# Altium PCB MiniPC.PcbDoc (part 23 of 24)
Units mm, origin at the board's own origin, x right, y up, seen from the top; angles counter-clockwise.
Board outline 175 x 155 mm, 16 copper layers (1_Top, 2_int1_(gnd), 3_int2_(power), 4_int3_(gnd), 5_int4_(sign), 6_int5_(power), 7_int6_(sign), 8_int7_(power), 9_int8_(gnd), 10_int9_(sign), 11_int10_(gnd), 12_int11_(sign), 13_int12_(gnd), 14_int13_(power), 15_int14_(gnd), 16_Bottom), stack 2.008 mm thick; 1046 components, 837 nets, 6010 pads, 4009 vias.
Unrouted connection lines stored in the file: 564.
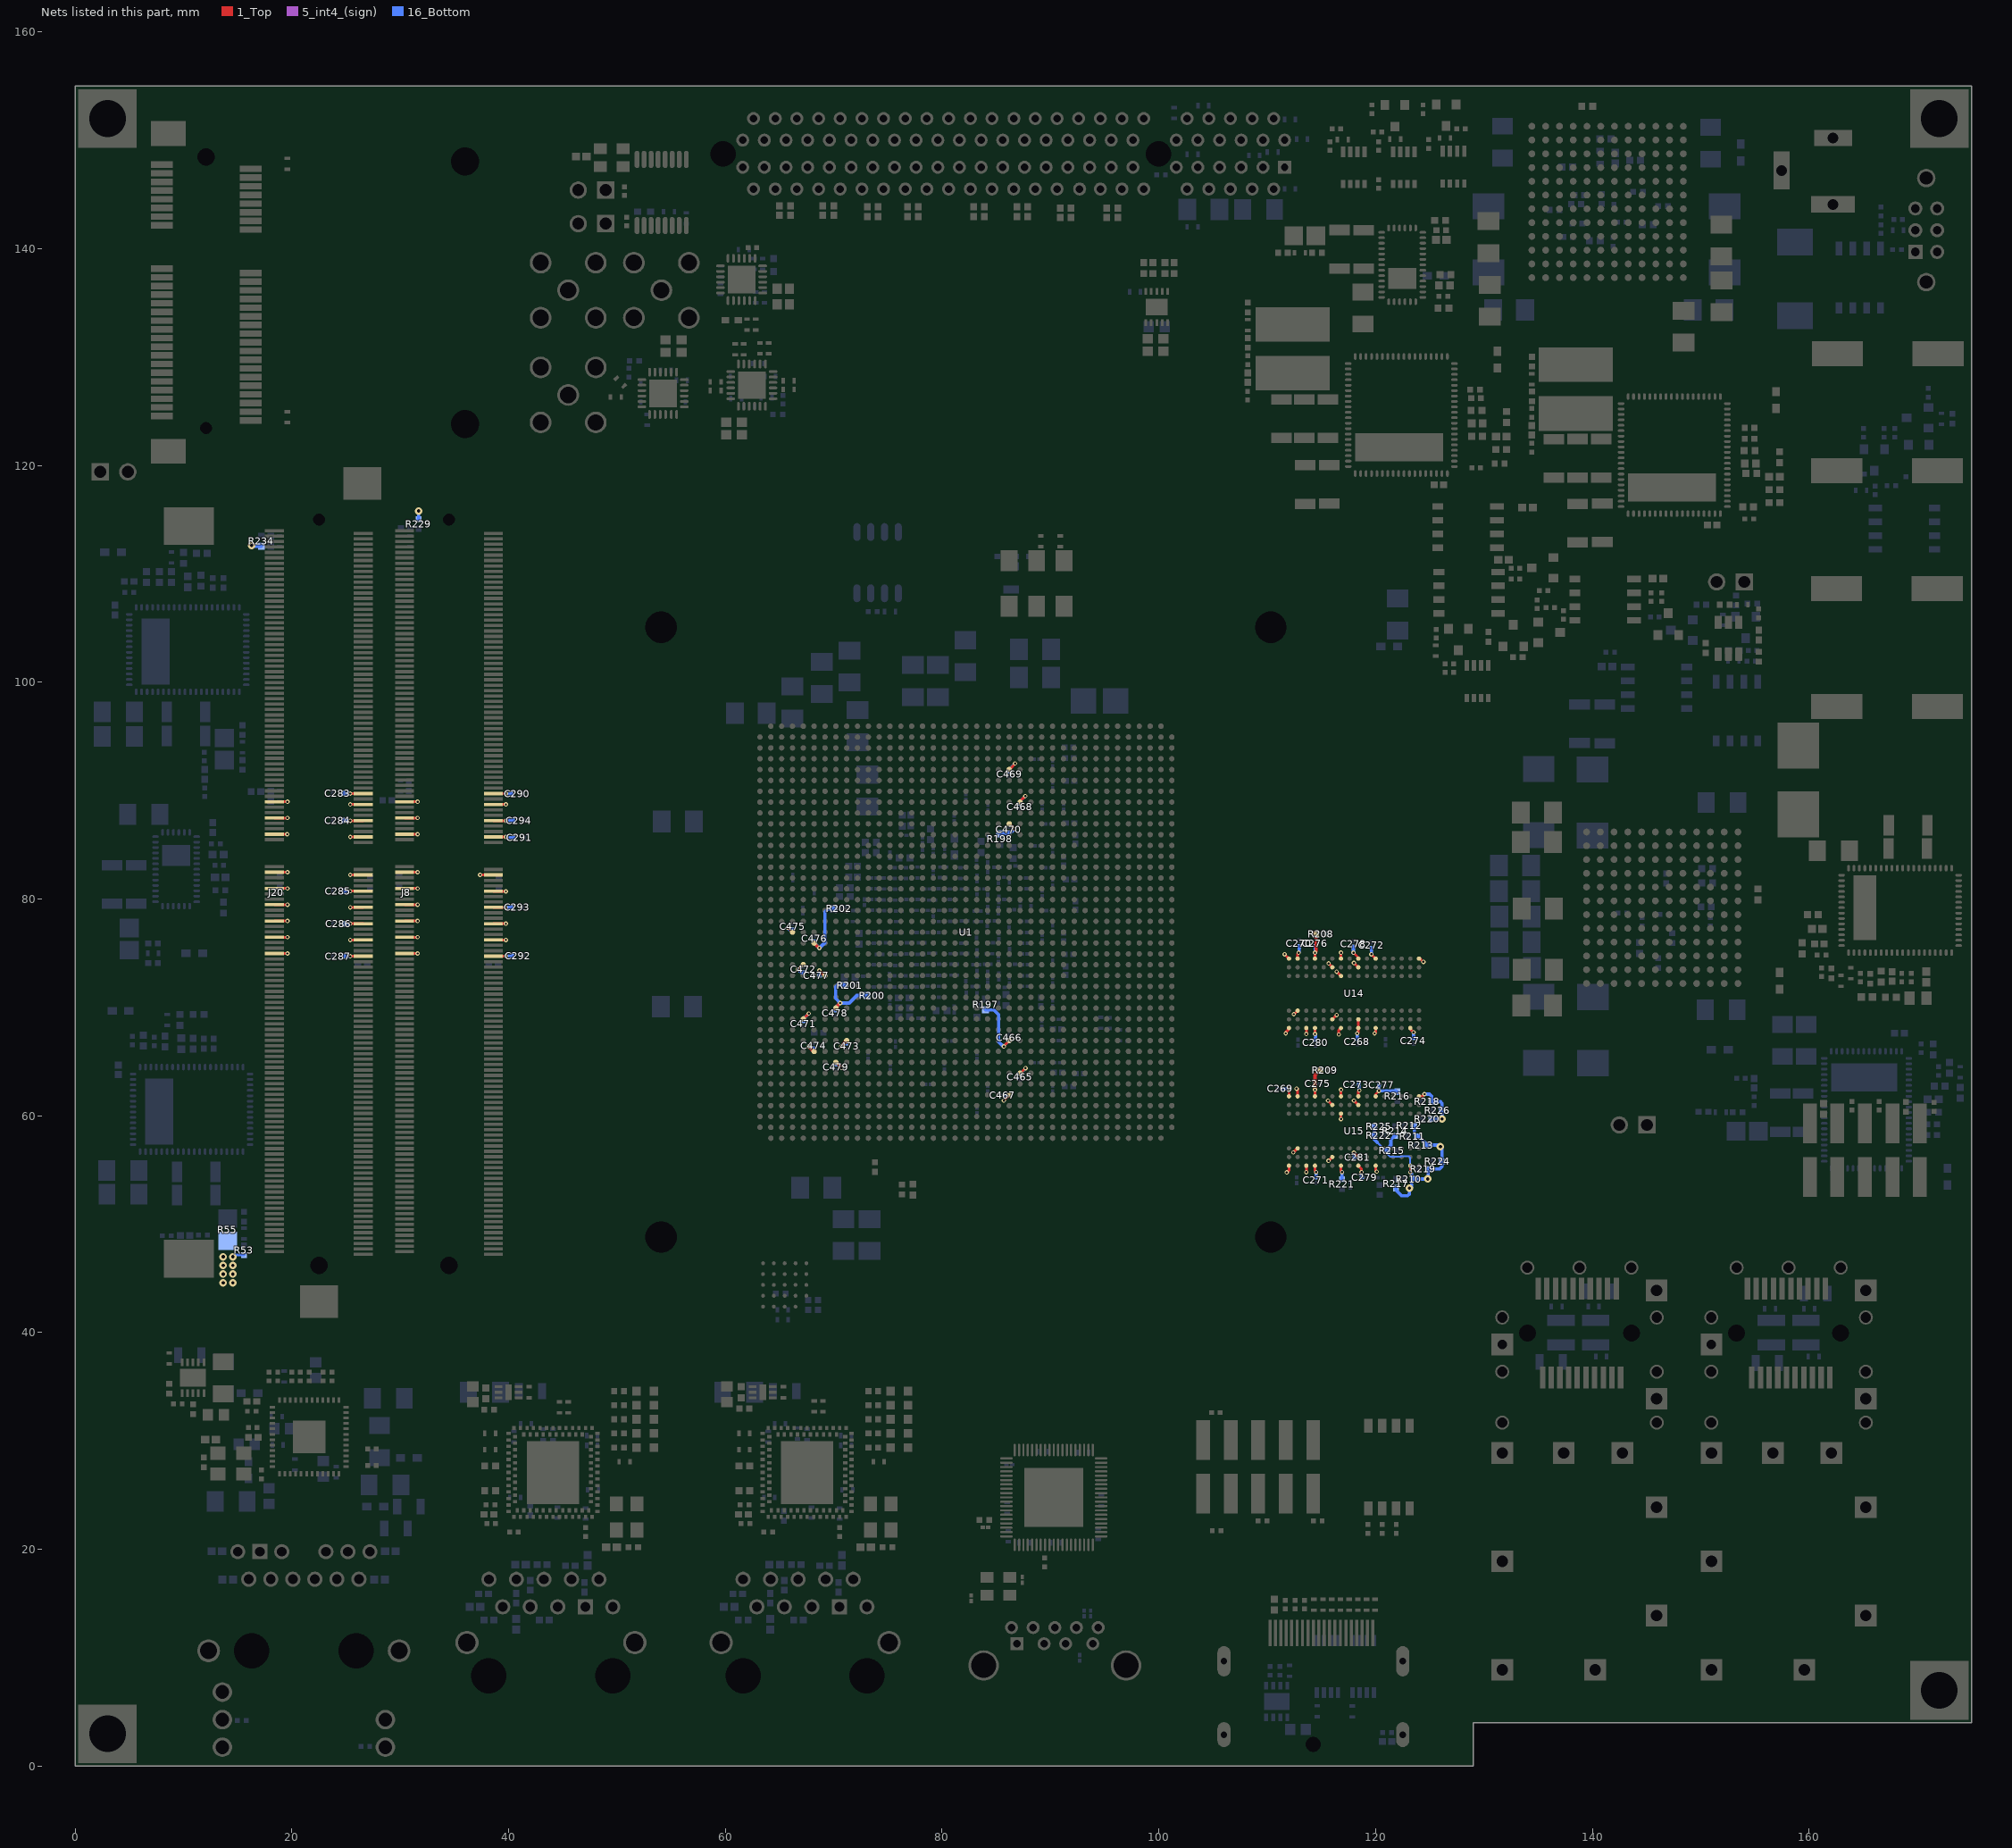
[diagram p35: the nets of this part, all layers, seen from the top]

## Via types
v1: diameter 0.4, hole 0.2, 1_Top to 16_Bottom, tented both sides, 1658 vias
v2: diameter 0.5, hole 0.2, 1_Top to 16_Bottom, tented both sides, 1014 vias
v3: diameter 0.7, hole 0.3, 1_Top to 16_Bottom, tented both sides, 915 vias
v4: diameter 0.6, hole 0.2, 1_Top to 16_Bottom, tented both sides, 278 vias
v5: diameter 0.4, hole 0.2, 1_Top to 16_Bottom, 93 vias
v6: diameter 0.4/0/0/0/0/0/0/0/0/0/0/0/0/0/0/0.4 (per signal layer), hole 0.2, 1_Top to 16_Bottom, tented both sides, 18 vias
v7: diameter 0.4/0/0/0/0/0/0/0/0/0/0/0.4/0.4/0.4/0.4/0.4 (per signal layer), hole 0.2, 1_Top to 16_Bottom, tented both sides, 16 vias
v8: diameter 0.5, hole 0.254, 1_Top to 16_Bottom, tented both sides, 15 vias
v9: diameter 0.5, hole 0.2, 1_Top to 16_Bottom, 2 vias

## Nets (pads, with @x,y where several pads share a name; then routed paths per layer and width w, separated by ;. In a path a pad name is that pad's centre, name@x,y a point inside that pad or via, vN(x,y) a via of type N, cw(c..) or ccw(c..) an arc to the next point about the centre after c; other vN are vias at no path point) (continued)
VDD_DDR: C268.2 C269.2 C270.2 C271.2 C272.2 C273.2 C274.2 C275.2 C276.2 C277.2 C278.2 C279.2 C280.2 C281.2 C283.1 C284.1 C285.1 C286.1 C287.1 C290.1 C291.1 C292.1 C293.1 C294.1 C465.2 C466.2 C467.2 C468.2 C469.2 C470.2 C471.2 C472.2 C473.2 C474.2 C475.2 C476.2 C477.2 C478.2 C479.2 J8.111 J8.112 J8.117 J8.118 J8.123 J8.124 J8.129 J8.130 J8.135 J8.136 J8.141 J8.142 J8.147 J8.148 J8.153 J8.154 J8.159 J8.160 J8.163 J20.111 J20.112 J20.117 J20.118 J20.123 J20.124 J20.129 J20.130 J20.135 J20.136 J20.141 J20.142 J20.147 J20.148 J20.153 J20.154 J20.159 J20.160 J20.163 R53.2 R55.1 R197.1 R198.1 R200.1 R201.1 R202.1 R208.2 R209.2 R210.2 R211.1 R212.1 R213.1 R214.1 R215.1 R216.1 R217.1 R218.1 R219.1 R220.1 R221.1 R222.1 R224.1 R225.1 R226.1 R229.1 R234.1 U1.AA6 U1.AC5 U1.AD7 U1.AG8 U1.AH5 U1.AK9 U1.AK24 U1.AL6 U1.AM8 U1.AN25 U1.AR24 U1.E24 U1.H25 U1.K24 U1.Y4 U14.A1 U14.A9 U14.B3 U14.B9 U14.C1 U14.D1 U14.D9 U14.F2 U14.F8 U14.G1 U14.G7 U14.G9 U14.J1 U14.J2 U14.J8 U14.J9 U14.L1 U14.L9 U14.R1 U14.T9 U15.A1 U15.A9 U15.B3 U15.B9 U15.C1 U15.D1 U15.D9 U15.F2 U15.F8 U15.G1 U15.G7 U15.G9 U15.J1 U15.J2 U15.J8 U15.J9 U15.L1 U15.L9 U15.R1 U15.T9 | length 155.2
  1_Top w0.25: J20.112@18.4,74.975 v1(19.602,74.975) ; J20.118@18.4,76.475 v1(19.602,76.475) ; J20.124@18.4,77.975 v1(19.602,77.975) ; J20.130@18.4,79.475 v1(19.602,79.475) ; J20.136@18.4,80.975 v1(19.602,80.975) ; J20.142@18.4,82.475 v1(19.602,82.475) ; J20.148@18.4,85.975 v1(19.572,85.975) ; J20.154@18.4,87.475 v1(19.602,87.475) ; J20.160@18.4,88.975 v1(19.602,88.975) ; v1(25.398,74.725) J20.111@26.6,74.725 ; v1(25.398,76.225) J20.117@26.6,76.225 ; v1(25.398,77.725) J20.123@26.6,77.725 ; v1(25.398,79.225) J20.129@26.6,79.225 ; v1(25.398,80.725) J20.135@26.6,80.725 ; v1(25.398,82.225) J20.141@26.6,82.225 ; v1(25.398,85.725) J20.147@26.6,85.725 ; v1(25.398,87.225) J20.153@26.6,87.225 ; v1(25.398,88.725) J20.159@26.6,88.725 ; v1(25.398,89.725) J20.163@26.6,89.725 ; J8.112@30.4,74.975 v1(31.602,74.975) ; J8.118@30.4,76.475 v1(31.602,76.475) ; J8.124@30.4,77.975 v1(31.602,77.975) ; J8.130@30.4,79.475 v1(31.602,79.475) ; J8.136@30.4,80.975 v1(31.602,80.975) ; J8.142@30.4,82.475 v1(31.602,82.475) ; J8.148@30.4,85.975 v1(31.602,85.975) ; J8.154@30.4,87.475 v1(31.602,87.475) ; J8.160@30.4,88.975 v1(31.602,88.975) ; v1(37.375,82.225) J8.141@38.6,82.225 ; J8.111@38.6,74.725 v1(39.75,74.725) ; J8.117@38.6,76.225 v1(39.75,76.225) ; J8.123@38.6,77.725 v1(39.75,77.725) ; J8.129@38.6,79.225 v1(39.725,79.225) ; J8.135@38.6,80.725 J8.135@38.621,80.704 ; J8.147@38.6,85.725 v1(39.75,85.725) ; J8.153@38.6,87.225 v1(39.75,87.225) ; J8.159@38.6,88.725 v1(39.75,88.725) ; J8.163@38.6,89.725 v1(39.75,89.725) ; v1(39.752,80.704) J8.135@38.621,80.704 ; v1(65.725,77.35) 65.725,77.311 65.822,77.311 U1.Y4@66.194,76.939 U1.Y4@66.161,76.939 ; v1(66.7,73.5) 67.139,73.939 U1.AC5@67.194,73.939 U1.AC5@67.194,73.919 ; U1.AH5@67.194,68.939 v1(67.694,69.439) ; v1(85.7,61.4) 85.7,61.445 U1.AR24@86.194,61.939 ; v1(85.7,66.4) 85.7,66.445 U1.AK24@86.194,66.939 ; U1.K24@86.194,86.939 86.683,86.45 v1(86.7,86.45) ; U1.E24@86.194,91.939 86.725,92.47 v1(86.725,92.5) ; U1.AN25@87.194,63.939 87.239,63.939 v1(87.7,64.4) ; U1.H25@87.194,88.939 87.194,89.019 v1(87.675,89.5) ; v1(111.6,74.9) U14.A9@112,74.5 ; v1(111.7,67.6) 111.7,67.7 112,68 U14.A1@112,68.1 ; v1(111.8,54.775) 112,54.975 U15.A1@112,55.4 ; U15.A9@112,61.8 v1(112,62.5) ; v1(112.4,56.622) 112.778,57 U15.B3@112.8,57 ; v1@112.439,69.383 v1(112.45,69.372) 112.461,69.361 U14.B3@112.8,69.7 ; v1(112.7,62.5) 112.8,62.5 U15.B9@112.8,61.8 ; U14.B9@112.8,74.5 112.8,74.95 v1(112.9,75.05) ; v1(113.6,54.8) U15.C1@113.6,55.4 ; v1(113.6,67.55) U14.C1@113.6,68.1 ; U15.D1@114.4,55.4 114.4,54.9 v1(114.5,54.8) ; U15.D9@114.4,61.8 v1(114.4,62.4) ; v1(114.4,67.55) U14.D1@114.4,68.1 ; U14.D9@114.4,74.5 v1(114.4,75.05) ; v1(115.6,61.4) U15.F8@116,61 ; v1(115.65,55.85) U15.F2@116,56.2 ; v1(115.661,74.061) 115.661,74.039 U14.F8@116,73.7 ; U14.F2@116,68.9 v1(116.4,69.3) ; v1(116.4,73.3) U14.G7@116.8,72.9 ; v1(116.6,67.5) 116.6,67.9 U14.G1@116.8,68.1 ; U15.G1@116.8,55.4 116.8,54.9 v1(116.9,54.8) ; v1(116.8,59.7) U15.G7@116.8,60.2 ; U15.G9@116.8,61.8 v1(116.8,62.4) ; U14.G9@116.8,74.5 v1(116.8,75.05) ; v1(117.95,75.05) 118.4,74.6 U14.J9@118.4,74.5 ; v1(118,56.6) U15.J2@118.4,56.2 ; v1(118,61.4) U15.J8@118.4,61 ; v1(118,74.1) U14.J8@118.4,73.7 ; v1(118.3,67.6) 118.35,67.6 118.4,67.65 U14.J1@118.4,68.1 U14.J2@118.4,68.9 ; U15.J1@118.4,55.4 118.675,55.125 118.675,54.8 v1(118.7,54.8) ; U15.J9@118.4,61.8 118.4,62.25 v1(118.5,62.35) ; v1(119.6,74.9) U14.L9@120,74.5 ; v1(119.9,67.6) 120,67.7 U14.L1@120,68.1 ; U15.L1@120,55.4 120,54.95 v1(120.1,54.85) ; U15.L9@120,61.8 120,62 v1(120.3,62.3) ; v1(123.2,54.8) U15.R1@123.2,55.4 ; U14.R1@123.2,68.1 123.2,68 v1(123.5,67.7) ; U15.T9@124,61.8 124.3,61.8 v1(124.5,62) ; U14.T9@124,74.5 124.078,74.5 124.378,74.2 v1(124.4,74.2) ; J8.135@38.621,80.704 38.617,80.7 38.613,80.704 J8.135@38.621,80.704
  1_Top w0.3: v1(67.675,66.4) 68.136,65.939 U1.AL6@68.194,65.939 ; U1.AA6@68.194,75.939 68.194,75.931 68.65,75.475 v1(68.675,75.475) ; v1(68.675,73.4) 69.136,72.939 U1.AD7@69.194,72.939 ; U1.AM8@70.194,64.939 70.236,64.939 70.725,64.45 v1(70.725,64.425) ; U1.AG8@70.194,69.939 70.194,69.994 v1(70.6,70.4) ; v1(70.675,66.4) 70.675,66.42 U1.AK9@71.194,66.939 ; v1(114.4,62.4) 114.4,63.778 114.833,64.211 R209.2@114.891,64.211 ; v1(114.4,75.05) 114.5,75.15 114.5,76.756 R208.2@114.503,76.759
  5_int4_(sign) w0.25: v1@65.725,77.311 v1(65.725,77.35)
  16_Bottom w0.17: 120.15,57.55 120.9,56.8 R215.1@121.075,56.8 121.075,56.504 121.354,56.225 122.325,56.225 122.383,56.283 123.017,56.283 123.175,56.125 123.175,56.012 123.165,56.002 123.165,54.835 v1(123.2,54.8)
  16_Bottom w0.25: v3@14.61,47.16 R53.2@15.59,47.16 ; v1(85.7,61.4) 85.86,61.56 C467.2@85.86,61.9 ; v1(85.7,66.4) 85.7,66.44 C466.2@86.2,66.94 ; C470.2@86.175,86.165 86.415,86.165 v1(86.7,86.45) ; C469.2@86.225,91.76 86.225,92 v1(86.725,92.5) ; C468.2@87.175,88.76 87.175,89 v1(87.675,89.5) ; C465.2@87.2,63.86 87.7,64.36 v1(87.7,64.4)
  16_Bottom w0.3: v3(16.3,112.6) 16.35,112.55 R234.1@17.2,112.55 ; C284.1@24.757,87.249 24.781,87.225 v1(25.398,87.225) ; C283.1@24.757,89.764 24.796,89.725 v1(25.398,89.725) ; C287.1@24.782,74.727 24.784,74.725 v1(25.398,74.725) ; C285.1@24.782,80.721 24.786,80.725 v1(25.398,80.725) ; C286.1@24.808,77.724 C286.1@24.808,77.724 v1(25.398,77.725) ; R229.1@31.7,115.025 v3(31.7,115.8) ; v1(39.725,79.225) 39.727,79.223 C293.1@40.318,79.223 ; v1(39.75,74.725) 39.777,74.752 C292.1@40.394,74.752 ; v1(39.75,85.725) 39.801,85.674 C291.1@40.496,85.674 ; v1(39.75,87.225) 39.774,87.249 C294.1@40.47,87.249 ; v1(39.75,89.725) 39.762,89.713 C290.1@40.292,89.713 ; v1(65.725,77.35) 65.885,77.19 C475.2@66.219,77.19 ; v1(66.7,73.5) 66.96,73.24 C472.2@67.225,73.24 ; C471.2@67.225,68.735 67.225,68.97 v1(67.694,69.439) ; v1(67.675,66.4) 67.86,66.215 C474.2@68.15,66.215 ; C476.2@68.253,76.09 68.253,75.897 v1(68.675,75.475) 69.2,76 69.2,78.825 69.4,79.025 69.925,79.025 R202.1@70,79.1 ; v1(68.675,73.4) 68.685,73.39 C477.2@68.685,72.925 ; C478.2@70.15,69.735 70.15,69.95 v1(70.6,70.4) ; C479.2@70.2,64.76 70.39,64.76 v1(70.725,64.425) ; v1(70.675,66.4) 70.96,66.685 C473.2@71.2,66.685 ; R201.1@71,72.05 70.325,72.05 70.175,71.9 70.175,70.825 v1(70.6,70.4) ; R200.1@73.05,71.1 72.125,71.1 71.425,70.4 v1(70.6,70.4) ; R197.1@84,69.775 84.775,69.775 85.2,69.35 85.2,66.85 85.65,66.4 v1(85.7,66.4) ; R198.1@85.325,86.025 86.035,86.025 C470.2@86.175,86.165 ; C269.2@111.46,62.5 v1(112,62.5) ; v1(112.9,75.05) 112.95,75.1 C270.2@112.95,75.64 ; C275.2@114.39,62.95 114.39,62.41 v1(114.4,62.4) ; v1(114.4,67.55) 114.45,67.5 C280.2@114.45,67.01 ; v1(114.4,75.05) 114.425,75.075 C276.2@114.425,75.64 ; C271.2@114.5,54.335 v1@114.5,54.8 ; R221.1@116.9,54.15 v1@116.9,54.8 ; v1(117.95,75.05) C278.2@117.95,75.59 ; v1(118,56.6) 118.065,56.535 C281.2@118.065,56.175 ; C268.2@118.3,67.11 v1@118.3,67.6 ; C273.2@118.46,62.9 118.46,62.39 v1(118.5,62.35) ; v1(118.7,54.8) 118.7,54.315 C279.2@118.715,54.3 ; v1(119.6,74.9) C272.2@119.6,75.49 ; R225.1@119.875,59 R222.1@119.875,58.2 119.875,57.825 120.15,57.55 ; C277.2@120.315,62.825 120.315,62.315 v1(120.3,62.3) 121.925,62.3 R216.1@122,62.225 ; R215.1@121.075,56.8 121.075,57 121.107,57 121.4,57.293 121.4,57.707 121.375,57.732 121.375,57.782 121.768,58.175 R214.1@121.8,58.175 ; R217.1@121.87,53.325 121.87,53.145 122.385,52.63 122.96,52.63 123.1,52.77 v3(123.1,53.325) ; v3@123.15,53.25 123.325,53.425 R210.2@123.325,54.175 ; v1(123.2,54.8) 123.325,54.675 R210.2@123.325,54.175 ; C274.2@123.5,67.185 v1(123.5,67.7) ; R212.1@123.525,59.1 123.575,59.05 123.575,58.35 R211.1@123.825,58.1 123.974,58.1 124.625,57.449 R213.1@124.625,57.3 125.825,57.3 v3(125.975,57.15) 126.125,57 R224.1@126.125,55.8 126.125,55.325 125.9,55.1 R219.1@124.825,55.1 124.85,55.075 124.85,54.175 v3(124.8,54.175) R210.2@123.325,54.175 ; v1(124.5,62) 124.975,62 125.175,61.8 R218.1@125.175,61.3 125.975,61.3 126.125,61.15 R226.1@126.125,60.5 126.125,59.775 126.05,59.7 R220.1@125.175,59.7
  other v3: 13.67,44.6 14.57,44.6 13.67,45.4 14.57,45.4 13.67,46.2 14.57,46.2 13.67,47 14.57,47 126.125,59.7
pads on no net: D3.5 D3.6 D4.5 D4.6 J6.15 J6.17 J6.25 J7.2 J7.3 J7.5 J7.6 J7.7 J7.8 J7.9 J7.MH1 J7.MH2 J8.87 J8.88 J8.91 J8.92 J8.95 J8.96 J8.97 J8.100 J8.101 J8.104 J8.105 J8.110 J8.134 J8.157 J8.161 J8.162 J8.165 J8.MH1 J8.MH2 J9.MH1 J9.MH2 J10.MH1 J10.MH2 J11.15 J11.MH1 J11.MH2 J12.6 J12.8 J13.3 J13.5 J13.6 J13.8 J13.10 J13.12 J13.14 J13.16 J13.17 J13.19 J13.24 J13.28 J13.39 J13.41 J13.42 J13.45 J13.46 J13.47 J13.48 J13.49 J13.51 J13.MH1 J13.MH2 J14.A5 J14.A6 J14.A7 J14.A8 J14.A19 J14.A32 J14.A33 J14.B5 J14.B9 J14.B11 J14.B12 J14.B30 J14.MH1 J14.MH2 J20.87 J20.88 J20.91 J20.92 J20.95 J20.96 J20.97 J20.100 J20.101 J20.104 J20.105 J20.110 J20.134 J20.157 J20.161 J20.162 J20.165 J20.MH1 J20.MH2 J21.2 J21.3 J21.4 J21.5 J21.6 J21.7 J21.8 J21.9 J21.MH1 J21.MH2 SW1.3 SW1.4 SW1.5 SW1.6 SW1.MH1 SW1.MH2 SW2.1 U1.A2 U1.A3 U1.A4 U1.A5 U1.A10 U1.A14 U1.A15 U1.A17 U1.A18 U1.A28 U1.A32 U1.A33 U1.AC2 U1.AC3 U1.AC7 U1.AC8 U1.AC9 U1.AC11 U1.AD8 U1.AD9 U1.AD10 U1.AE7 U1.AE10 U1.AE11 U1.AE20 U1.AF7 U1.AF9 U1.AF10 U1.AF14 U1.AF15 U1.AF17 U1.AF20 U1.AG5 U1.AG6 U1.AG14 U1.AG15 U1.AG16 U1.AG17 U1.AG20 U1.AG21 U1.AG22 U1.AG24 U1.AH6 U1.AH12 U1.AH13 U1.AH14 U1.AH21 U1.AH22 U1.AH30 U1.AH31 U1.AH39 U1.AJ5 U1.AJ6 U1.AJ11 U1.AJ13 U1.AJ14 U1.AJ15 U1.AJ20 U1.AJ21 U1.AJ32 U1.AJ33 U1.AJ36 U1.AJ37 U1.AK6 U1.AK13 U1.AK15 U1.AK20 U1.AK21 U1.AK22 U1.AK30 U1.AK31 U1.AK34 U1.AK35 U1.AL2 U1.AL14 U1.AL20 U1.AL22 U1.AL24 U1.AL32 U1.AL33 U1.AM2 U1.AM11 U1.AM14 U1.AM21 U1.AM22 U1.AM30 U1.AM31 U1.AM34 U1.AM35 U1.AM38 U1.AM39 U1.AN2 U1.AN8 U1.AN11 U1.AN21 U1.AN22 U1.AN28 U1.AN29 U1.AN32 U1.AN33 U1.AN36 U1.AN37 U1.AP1 U1.AP10 U1.AP21 U1.AP24 U1.AP30 U1.AP31 U1.AP34 U1.AP35 U1.AP38 U1.AP39 U1.AR7 U1.AR10 U1.AR11 U1.AR21 U1.AR22 U1.AR23 U1.AR28 U1.AR29 U1.AR32 U1.AR33 U1.AR36 U1.AR37 U1.AT2 U1.AT7 U1.AT8 U1.AT9 U1.AT10 U1.AT12 U1.AT13 U1.AT22 U1.AT34 U1.AT35 U1.AT38 U1.AT39 U1.AU7 U1.AU10 U1.AU11 U1.AU12 U1.AU21 U1.AU22 U1.AU36 U1.AU37 U1.AV1 U1.AV2 U1.AV3 U1.AV7 U1.AV8 U1.AV21 U1.AV29 U1.AV30 U1.AV34 U1.AV35 U1.AV38 U1.AV39 U1.AW2 U1.AW3 U1.AW8 U1.AW20 U1.AW23 U1.AW30 U1.B1 U1.B4 U1.B5 U1.B6 U1.B7 U1.B14 U1.B15 U1.B16 U1.B21 U1.B24 U1.B26 U1.B30 U1.B31 U1.C1 U1.C2 U1.C3 U1.C4 U1.C6 U1.C7 U1.C8 U1.C11 U1.C12 U1.C16 U1.C17 U1.C18 U1.C19 U1.C21 U1.C22 U1.C23 U1.C25 U1.C26 U1.C32 U1.C33 U1.D1 U1.D3 U1.D4 U1.D5 U1.D6 U1.D8 U1.D10 U1.D11 U1.D18 U1.D19 U1.D20 U1.D21 U1.D23 U1.D34 U1.D35 U1.D38 U1.D39 U1.E1 U1.E2 U1.E3 U1.E5 U1.E6 U1.E7 U1.E8 U1.E10 U1.E11 U1.E12 U1.E13 U1.E15 U1.E16 U1.E17 U1.E18 U1.E21 U1.E22 U1.E26 U1.E36 U1.E37 U1.F2 U1.F3 U1.F4 U1.F5 U1.F7 U1.F8 U1.F9 U1.F10 U1.F12 U1.F13 U1.F14 U1.F15 U1.F17 U1.F25 U1.F34 U1.F35 U1.F38 U1.F39 U1.G1 U1.G2 U1.G4 U1.G5 U1.G6 U1.G7 U1.G9 U1.G10 U1.G11 U1.G12 U1.G14 U1.G16 U1.G24 U1.G36 U1.G37 U1.H1 U1.H2 U1.H3 U1.H4 U1.H6 U1.H7 U1.H8 U1.H9 U1.H11 U1.H12 U1.H13 U1.H14 U1.H16 U1.H17 U1.H21 U1.H22 U1.H23 U1.H34 U1.H35 U1.H38 U1.H39 U1.J1 U1.J3 U1.J4 U1.J5 U1.J6 U1.J8 U1.J9 U1.J10 U1.J11 U1.J13 U1.J14 U1.J15 U1.J16 U1.J18 U1.J19 U1.J20 U1.J21 U1.J23 U1.J26 U1.J36 U1.J37 U1.K1 U1.K2 U1.K3 U1.K5 U1.K6 U1.K7 U1.K8 U1.K10 U1.K11 U1.K12 U1.K13 U1.K15 U1.K16 U1.K17 U1.K18 U1.K22 U1.K23 U1.K25 U1.K30 U1.K31 U1.K34 U1.K35 U1.K38 U1.K39 U1.L2 U1.L3 U1.L4 U1.L5 U1.L7 U1.L8 U1.L9 U1.L10 U1.L12 U1.L13 U1.L14 U1.L15 U1.L17 U1.L18 U1.L19 U1.L20 U1.L22 U1.L23 U1.L24 U1.L28 U1.L29 U1.L32 U1.L33 U1.L36 U1.L37 U1.M1 U1.M2 U1.M4 U1.M5 U1.M6 U1.M7 U1.M9 U1.M10 U1.M11 U1.M12 U1.M14 U1.M17 U1.M19 U1.M20 U1.M21 U1.M22 U1.M30 U1.M31 U1.M34 U1.M35 U1.M38 U1.M39 U1.N1 U1.N2 U1.N3 U1.N4 U1.N6 U1.N7 U1.N8 U1.N9 U1.N11 U1.N12 U1.N13 U1.N14 U1.N19 U1.N20 U1.N22 U1.N23 U1.N28 U1.N29 U1.N32 U1.N33 U1.N36 U1.N37 U1.P1 U1.P3 U1.P4 U1.P5 U1.P6 U1.P8 U1.P9 U1.P10 U1.P11 U1.P14 U1.P15 U1.P19 U1.P20 U1.P30 U1.P31 U1.P34 U1.P35 U1.P38 U1.P39 U1.R1 U1.R2 U1.R3 U1.R5 U1.R6 U1.R7 U1.R8 U1.R10 U1.R11 U1.R28 U1.R29 U1.R32 U1.R33 U1.R36 U1.R37 U1.T2 U1.T3 U1.T4 U1.T5 U1.T7 U1.T8 U1.T9 U1.T30 U1.T31 U1.T34 U1.T35 U1.T38 U1.T39 U1.U1 U1.U2 U1.U4 U1.U5 U1.U6 U1.U7 U1.U9 U1.U10 U1.U11 U1.U32 U1.U33 U1.U36 U1.U37 U1.V1 U1.V2 U1.V3 U1.V4 U1.V6 U1.V7 U1.V8 U1.V9 U1.V11 U1.V30 U1.V31 U1.V34 U1.V35 U1.V38 U1.V39 U1.W3 U1.W4 U1.W5 U1.W6 U1.W9 U1.W10 U1.W15 U1.W16 U1.W28 U1.W29 U1.W32 U1.W33 U1.W36 U1.W37 U1.Y7 U1.Y30 U1.Y31 U2.1 U2.2 U2.3 U2.4 U2.5 U2.6 U2.7 U2.8 U2.9 U2.10 U2.11 U2.12 U2.13 U2.14 U2.15 U2.25 U2.26 U2.27 U2.44 U2.45 U2.48 U2.49 U2.54 U2.56 U2.59 U2.62 U2.63 U2.64 U2.65 U2.66 U2.67 U2.68 U3.1 U3.2 U3.3 U3.4 U3.5 U3.6 U3.7 U3.8 U3.9 U3.10 U3.11 U3.12 U3.13 U3.14 U3.15 U3.16 U3.17 U3.18 U3.19 U3.29 U3.30 U3.31 U3.52 U3.53 U3.56 U3.57 U3.59 U3.62 U3.64 U3.67 U3.70 U3.71 U3.72 U3.73 U3.74 U3.75 U3.76 U4.1 U4.2 U4.3 U4.4 U4.5 U4.6 U4.7 U4.8 U4.9 U4.10 U4.11 U4.12 U4.13 U4.14 U4.15 U4.25 U4.26 U4.27 U4.44 U4.45 U4.48 U4.49 U4.54 U4.56 U4.59 U4.62 U4.63 U4.64 U4.65 U4.66 U4.67 U4.68 U5.1 U5.2 U5.3 U5.4 U5.5 U5.6 U5.7 U5.8 U5.9 U5.10 U5.11 U5.12 U5.13 U5.14 U5.15 U5.25 U5.26 U5.27 U5.44 U5.45 U5.48 U5.49 U5.54 U5.56 U5.59 U5.62 U5.63 U5.64 U5.65 U5.66 U5.67 U5.68 U6.1 U6.2 U6.3 U6.4 U6.12 U6.22 U6.23 U6.24 U6.25 U6.29 U6.34 U6.35 U6.36 U6.37 U6.38 U7.1 U7.2 U7.3 U7.4 U7.5 U7.6 U7.7 U7.8 U7.9 U7.10 U7.11 U7.12 U7.13 U7.14 U7.15 U7.16 U7.17 U7.18 U7.19 U7.29 U7.30 U7.31 U7.52 U7.53 U7.56 U7.57 U7.62 U7.64 U7.67 U7.70 U7.71 U7.72 U7.73 U7.74 U7.75 U7.76 U8.1 U8.2 U8.3 U8.4 U8.12 U8.22 U8.23 U8.24 U8.25 U8.29 U8.34 U8.35 U8.36 U8.37 U8.38 U10.A5 U10.B10 U10.C10 U10.D8 U10.D10 U10.E4 U10.E10 U10.E11 U10.F4 U10.F5 U10.F6 U10.F9 U10.G9 U10.H4 U10.H5 U10.H6 U10.H9 U10.H11 U10.J6 U10.J8 U10.J9 U10.K10 U10.L10 U10.M5 U11.13 U11.43 U11.45 U11.47 U12.1 U12.2 U12.3 U12.4 U12.5 U12.6 U12.7 U12.8 U12.9 U12.10 U12.11 U12.12 U12.13 U12.14 U12.15 U12.16 U12.25 U12.26 U12.27 U12.28 U12.47 U12.48 U12.55 U12.59 U12.61 U12.63 U12.64 U12.65 U12.66 U12.67 U12.68 U13.1 U13.2 U13.3 U13.7 U13.8 U14.T7 U15.T7 U16.1 U16.6 U16.7 U17.A2 U17.A4 U17.A5 U17.A7 U17.A20 U17.A26 U17.A27 U17.A28 U17.A43 U17.A45 U17.A47 U17.A48 U17.A49 U17.A50 U17.A51 U17.B1 U17.B2 U17.B4 U17.B11 U17.B18 U17.B21 U17.B22 U17.B25 U17.B26 U17.B33 U17.B37 U17.B39 U17.B40 U17.B42 U17.B43 U17.B44 U20.A2 U20.A4 U20.A5 U20.A7 U20.A20 U20.A26 U20.A27 U20.A28 U20.A43 U20.A45 U20.A47 U20.A48 U20.A49 U20.A50 U20.A51 U20.B1 U20.B2 U20.B4 U20.B11 U20.B18 U20.B21 U20.B22 U20.B25 U20.B26 U20.B33 U20.B37 U20.B39 U20.B40 U20.B42 U20.B43 U20.B44 U23.A5 U23.B10 U23.C10 U23.D8 U23.D10 U23.E10 U23.E11 U23.F9 U23.G9 U23.H4 U23.H5 U23.H6 U23.H11 U23.J6 U23.J8 U23.J9 U23.K10 U23.L10 U23.M5 U25.7 U26.A2 U26.A3 U26.A4 U26.A5 U26.B1 U26.B5 U26.C1 U26.C3 U26.C5 U26.D1 U26.D5 U26.E1 U26.E2 U26.E3 U26.E4 U26.E5 U27.5 U28.13 U28.14 U28.17 U28.18 U28.21 U28.22 U30.5 U30.9 U30.10 U30.13 U30.17 U30.18 U30.21 U30.22 U31.2 U31.4 U31.6 U31.11 U31.13 U31.15 U32.1 U32.2 U33.17 U33.18

## Polygon pours and split planes (outlines as drawn)
GND on 16_Bottom "16_Bottom_GND" (solid, remove dead copper, pour order 153): 0,0 129,0 129,4 175,4 175,155 0,155
A10_12V on 16_Bottom "Top_A10_12V" (solid, pour order 23): 155.64,67.86 152.04,67.86 152.04,90.62 151.08,91.58 151.08,98.58 152.04,98.58 155.64,98.58 160,98.58 160,80.54 158.04,80.54 158.04,74.5 155.64,72.1
3V3 on 16_Bottom "16_Bottom_3V3" (solid, pour order 26): 128.15,139.85 138.15,139.85 148.9,139.85 154.4,139.85 154.4,135.85 150.4,135.85 150.4,133.19 147.07,133.19 136.17,133.19 132.61,133.19 132.61,135.85 128.15,135.85
A10_0V9 on 16_Bottom "16_Bottom_A10_0V9" (solid, pour order 25): 141.91,88.6 141.91,82.62 140.55,82.62 140.55,75.74 141.91,75.74 141.91,69.69 137.89,69.69 133.49,69.69 133.49,73.48 133.49,82.78 133.49,88.6 137.89,88.6
MAIN_12V on 16_Bottom "16_Bottom_MAIN_12V" (solid, pour order 24): 130.05,152.925 130.05,154.125 152.83,154.125 152.83,149.925 144.05,149.925 144.05,151.175 139.8,151.175 139.8,150.425 139.8,149.925 130.05,149.925 130.05,152.675
MAIN_12V on 16_Bottom "16_Bottom_MAIN_12V" (solid, pour order 22): 156.8,136.1 162.1,136.1 162.1,138.5 162.1,138.6 167.2,138.6 167.2,133.925 167.2,132.4 163.9,129.1 163.9,125.3 168.225,125.3 168.225,123.975 168.225,123.84 163.95,123.84 163.95,119.6 163.95,115.3 166.9,115.3 166.9,111.5 166.8,111.4 163.1,111.4 158.3,111.4 158.3,131.7 156.7,131.7 156.5,131.7 156.5,133.925 156.5,136.1 156.7,136.1
NetC73_2 on 16_Bottom "16_Bottom-No Net" (solid, pour order 20): 156.4,142.6 156.4,138.9 166,138.9 168.1,138.9 168.1,139.44 168.1,140.175 167.6,140.175 167.25,140.175 167.25,139.2 165.9,139.2 165.9,146.3 158.7,146.3 158.7,144.5 156.4,144.5
GND on 1_Top "1_Top-GND" (solid, remove dead copper, pour order 151): 0,0 129,0 129,4 175,4 175,155 0,155
MAIN_12V on 1_Top "1_Top_MAIN_12V" (solid, pour order 21): 158.87,92 165.2,92 165.2,94.7 165.2,132.5 165.2,132.9 165.2,133.1 167,133.1 167.45,133.1 167.45,135.65 167.45,138.3 167,138.3 161,138.3 161,133.9 158.87,131.77 158.87,96.67 156.98,96.67 156.98,92
3V3 on 1_Top "top_3V3" (solid, pour order 28): 129.15,139.09 129.15,140.6 139.76,140.6 149.651,140.6 150.15,140.6 151.9,140.6 153.17,140.6 153.17,135.6 152.15,135.6 149.651,135.6 149.651,134.35 149.651,133.16 147.06,133.16 136.15,133.16 132.62,133.16 132.62,135.6 129.15,135.6 129.15,137.99
A10_0V9 on 1_Top "top_A10_0V9" (solid, pour order 27): 142.45,89.25 142.45,78.97 142.45,68.82 135.4,68.82 135.4,89.25
A10_12V on 1_Top "1_Top_A10_12V" (solid, pour order 141): 151.729,67.62 155.66,67.62 155.66,77.722 151.729,77.722
A10_12V on 1_Top "1_Top_A10_12V" (solid, pour order 139): 151.79,80.77 154.64,80.77 154.64,81.55 154.84,81.55 155.72,81.55 155.72,98.6 155.72,101.2 154.64,101.2 154.64,98.6 151.79,98.6
MAIN_12V on 1_Top "1_Top_Main_12V" (solid, remove dead copper, pour order 137): 143,153.53 143,149.75 153.13,149.75 153.13,153.53
MAIN_12V on 1_Top "1_Top_Main_12V" (solid, remove dead copper, pour order 135): 130.08,149.75 140,149.75 140,152.5 138.25,152.5 138.25,153.55 130.08,153.55
GND on 6_int5_(power) "6_GND" (solid, pour order 111): 0,0 129,0 129,4 175,4 175,155 0,155
PLL_1V8 on 6_int5_(power) "6_PLL_1V8" (solid, pour order 97): 133.825,108.95 133.825,105.15 133.825,51.225 87.375,51.225 83.9,54.7 83.9,66.337 75.4,66.337 75.4,75.1 75.4,85.5 75.4,86.4 84.5,86.4 84.5,91.6 82.186,93.914 81.9,94.2 80.1,94.2 80.15,94.8 80.15,105.15 80.15,108.95
GND on 3_int2_(power) "3_int2_(power)_GND" (solid, remove dead copper, pour order 162): 0,0 129,0 129,4 175,4 175,155 0,155
IO_2V5 on 3_int2_(power) "3_IO_2V5" (solid, pour order 121): 8.85,14 8.85,40.8 14.1,40.8 14.1,80.4 14.1,118.9 14.1,128.7 41.3,128.7 41.3,150.65 56.8,150.65 124.93,150.65 124.93,123.6 111.78,123.6 111.78,114.7 119.7,114.7 120.3,114.7 133.42,114.7 133.42,96.45 126.15,96.45 126.15,53.9 109.6,53.9 109.6,118.5 109.6,127.12 116.88,127.15 116.88,132.25 116.88,138.2 109.6,138.2 87.2,138.2 87.2,106.8 47.8,106.8 47.8,43.6 57.9,43.6 57.9,34.3 62.2,34.3 72.7,34.3 72.7,32.4 87.183,32.4 87.183,14 78.7,14 72.4,14
MAIN_12V on 3_int2_(power) "3_main_12V" (solid, remove dead copper, pour order 35): 148.651,96.9 148.651,69.1 145.8,69.1 145.8,61.5 143.76,61.5 143.76,55.99 159.37,55.99 159.37,71.6 163.45,71.6 163.45,107.7 154,107.7 151.5,107.7 145.35,107.7 145.35,102.96 144.09,102.96 136.85,102.96 136.85,108.47 134.53,108.47 134.53,96.9
A10_1V0 on 3_int2_(power) "3_A10_1V0" (solid, pour order 51): 89.4,136.94 89.4,137.7 116.32,137.7 116.32,127.99 108.4,127.99 108.4,61.3 89.4,61.3
A10_MAIN_3V3 on 3_int2_(power) "3_A10_MAIN_3V3" (solid, pour order 43): 139.6,122.9 113.05,122.9 113.05,115.58 133.96,115.58 133.96,109.65 137.6,109.65 137.6,105.05 144.84,105.05 144.84,110.6 164.55,110.6 164.55,70.85 160.18,70.85 160.18,65.57 169.83,65.57 169.83,57.45 174.32,57.45 174.32,65.57 174.32,122.9 144.2,122.9
A10_0V9 on 3_int2_(power) "3_A10_0V9" (solid, pour order 45): 127.9,95.5 146.5,95.5 146.5,71 144.17,71 144.17,63.12 140.29,63.12 140.29,52.9 144.17,52.9 144.17,30.7 96.6,30.7 89.5,37.8 63.5,37.8 63.5,103.678 67.2,103.678 89,103.678 89,59.5 108.3,59.5 108.3,52.9 126.9,52.9 126.9,59.5 126.9,95.5
MAIN_12V on 3_int2_(power) "3_main_12V" (solid, pour order 31): 155.3,133.2 168.1,133.2 168.1,154.5 129.77,154.5 129.77,146.3 150,146.3 150,133.2
GND on 7_int6_(sign) "7_int6_GND" (solid, remove dead copper, pour order 157): 0,0 129,0 129,4 175,4 175,155 0,155
GND_DP on 7_int6_(sign) "7_GND_DP" (solid, pour order 99): 105.175,11.55 123.55,11.55 123.575,11.575 123.6,11.55 123.6,1.1 105.175,1.1
2V5 on 7_int6_(sign) "7_2V5" (solid, pour order 39): 124.8,126.123 103.94,126.123 103.94,142.23 118.12,142.23 118.12,131.09 131.2,131.09 131.2,104.1 133,104.1 133,100.7 124.8,100.7
3V3 on 7_int6_(sign) "7_3V3" (solid, remove dead copper, pour order 37): 137.04,132 137.04,104.68 150.2,104.68 150.2,101.9 158.067,101.9 158.067,69.8 158.067,64.297 158.067,50.447 169.963,50.447 169.963,68 169.963,88.2 169.963,111.1 160.9,111.1 160.9,139.97 150.4,139.97 150.4,147.8 140.1,147.8 132.9,147.8 132.9,151.95 116.977,151.95 116.977,144.07 99.4,144.07 99.4,144.4 58.3,144.4 58.3,152.8 16.8,152.8 16.8,123.1 22.8,123.1 22.8,149.8 38.312,149.8 52.8,149.8 52.8,141.2 67.313,141.2 67.313,133.887 78.3,133.887 103.09,133.887 103.09,142.879 119.31,142.879 119.31,132
PCIE_12V on 7_int6_(sign) "7_PCIE_12V" (solid, pour order 33): 167.7,112.6 171.1,112.6 171.1,116 167.7,116 167.7,154.5 155.8,154.5 108.8,154.5 108.8,144.7 115.7,144.7 115.7,152.7 118.5,152.7 151.325,152.7 151.325,141.29 162.44,141.29 162.44,112.6 162.9,112.6
GND on 12_int11_(sign) "12_int11_GND" (solid, remove dead copper, pour order 160): 0,0 129,0 129,4 175,4 175,155 0,155
IO_3V3 on 12_int11_(sign) "12_IO_3V3" (solid, pour order 49): 97.3,137.2 97.3,131.9 131.5,131.9 131.5,130.3 145.4,130.3 169.2,130.3 169.2,72.7 169.2,25.8 160.7,25.8 160.7,41.2 135.9,41.2 135.9,12.1 122.7,12.1 107.9,12.1 107.9,7.9 102,7.9 102,22.3 99.3,22.3 85.755,22.3 85.755,19 99.3,19 99.3,7.9 99.3,4.6 53.3,4.6 34.1,4.6 34.1,6.198 34.1,24.6 28.5,24.6 28.5,20.6 31.6,20.6 31.6,1.3 32,1.3 71.3,1.3 103.455,1.3 103.455,4.6 107.9,4.6 107.9,3.1 117.7,3.1 117.7,4.6 143.9,4.6 143.9,15.8 173.6,15.8 173.6,133.5 173.6,135.5 169.2,135.5 131.5,135.5 131.5,148.1 125,148.1 125,137.2 122.7,137.2
FMCBVADJ on 12_int11_(sign) "12_FMCBVADJ" (solid, remove dead copper, pour order 91): 157.4,118.6 157.4,56.29 132.1,56.29 132.1,100.6 103.3,100.6 95.2,100.6 95.2,111.2 73.7,132.7 68.035,132.7 49.9,132.7 49.9,121.3 63.2,108 77.2,108 77.25,91.35 77.25,63.8 68.035,63.8 68.035,83.365 57.8,93.6 41.4,93.6 41.4,117.9 32.7,117.9 32.7,140.363 32.7,143.881 52.367,143.881 77.919,143.881 96.2,143.881 96.2,126.684 104.284,118.6 116.807,118.6
ENETA_DVDD on 12_int11_(sign) "12_ENETA_DVDD" (solid, pour order 55): 38.9,32.3 38.9,36.3 35.4,36.3 35.4,22.1 38.9,22.1 50.2,22.1 50.2,32.3
ENETB_DVDD on 12_int11_(sign) "12_ENETB_DVDD" (solid, pour order 57): 62,32.1 62,36.5 58.7,36.5 58.7,27.1 58.7,21.9 62.1,21.9 73.3,21.9 73.3,32.1
1.8V_DVDDH on 12_int11_(sign) "12_1.8_DVDDH" (solid, pour order 53): 17,32.7 17,31.2 17,27.3 26.8,27.3 26.8,35.5 21.5,35.5 17,35.5
GND on 10_int9_(sign) "10_int9_GND" (solid, remove dead copper, pour order 159): 0,0 129,0 129,4 175,4 175,155 0,155
A10_MAIN_1V8 on 10_int9_(sign) "10_A10_MAIN_1V8" (solid, pour order 89): 143.74,98.17 136.07,98.17 136.07,104.1 125.8,104.1 125.8,104.2 125.8,116.1 143.74,116.1
AGND8 on 10_int9_(sign) "10_AGND8" (solid, pour order 73): 158.5,53.5 158.5,50.41 173.87,50.41 173.87,67.2 168.72,67.2 168.72,53.5
AGND2 on 10_int9_(sign) "10_AGND2" (solid, pour order 67): 127.62,133.25 127.62,139.04 124.46,139.04 124.46,135.3 122.98,135.3 122.968,133.25
GND_SIGNAL1 on 10_int9_(sign) "10_GND_SIGNAL1" (solid, remove dead copper, pour order 69): 141.1,82.66 150.9,82.66 150.9,64.84 141.1,64.84 141.1,76.5
AGND5 on 10_int9_(sign) "10_AGND5" (solid, pour order 79): 4.8,112.8 7.5,112.8 7.5,111.7 14,111.7 14,109.325 13.975,109.3 14,109.275 14,107.4 4.8,107.4
1V8_PLL on 10_int9_(sign) "10_1V8_PLL" (solid, pour order 93): 58.1,140.4 58.1,140.3 58.1,132.6 66.8,132.6 66.8,140.4
AGND4 on 10_int9_(sign) "10_AGND4" (solid, pour order 77): 12.2,74.2 14.4,74.2 14.4,83.9 15.1,83.9 15.1,86.1 11.5,86.1 11.5,74.2
AGND7 on 10_int9_(sign) "10_AGND7" (solid, pour order 75): 5.4,70.5 5.4,64.7 13.8,64.7 13.8,70.5
AGND1 on 10_int9_(sign) "10_AGND1" (solid, pour order 71): 157.89,70.38 170.6,70.38 170.6,71.6 170.6,75.5 160.24,75.5 160.24,73.7 157.89,73.7
AGND6 on 10_int9_(sign) "10_AGND6" (solid, pour order 65): 129.68,128.81 129.68,123.61 127.63,123.61 127.63,120.71 131.03,120.71 131.03,118.81 133.3,118.81 133.3,128.81
AGND3 on 10_int9_(sign) "10_AGND3" (solid, pour order 63): 153.62,124.95 158.13,124.95 158.13,114.91 153.62,114.91
GND_SIGNAL2 on 10_int9_(sign) "10_GND_SIGNAL2" (solid, pour order 61): 139.5,147.7 139.5,149.7 146.8,149.7 146.8,147.7 154.2,147.7 154.2,138.6 139.5,138.6
GND on 5_int4_(sign) "5_int4_GND" (solid, remove dead copper, pour order 155): 0,0 129,0 129,4 175,4 175,155 0,155
IO_5V on 5_int4_(sign) "5_int4_IO_5V" (solid, remove dead copper, pour order 149): 167.05,88.06 174.33,88.06 174.33,17.96 174.33,10.33 167.69,10.33 167.69,6.835 156.3,6.835 126.99,6.835 126.99,0.48 7.806,0.48 7.806,6.835 3.08,6.835 3.08,19.05 3.08,38.47 10.8,38.47 10.8,12.8 32.573,12.8 32.573,35.658 42.97,35.658 42.97,22.18 39.25,22.18 39.262,12.8 53.564,12.8 53.564,36.39 66.25,36.39 66.25,32.77 64.025,32.77 64.025,4.143 100.163,4.143 113.98,17.96 126.99,17.96 167.05,17.96
A10_MAIN_3V3 on 5_int4_(sign) "5_A10_MAIN_3V3" (solid, pour order 81): 1.5,123.6 1.5,55.63 14.7,55.63 14.7,122.751 71.6,122.751 71.6,115.8 120.26,115.8 120.26,144.2 1.5,144.2
GND on 14_int13_(power) "14_int13_GND" (solid, remove dead copper, pour order 161): 0,0 129,0 129,4 175,4 175,155 0,155
IO_1V8 on 14_int13_(power) "14_IO_1V8" (solid, pour order 83): 134.6,117.7 134.6,110.7 123.9,110.7 123.9,75.6 101.7,75.6 101.7,43.287 101.7,38.8 101.7,37.5 123.9,37.5 125.371,37.539 125.401,15.799 121.599,15.799 46,15.799 6.7,15.799 6.7,20.581 6.7,39.1 56.7,39.1 62.697,39.1 62.697,55.1 62.697,74.7 70.364,74.7 86.7,74.7 86.7,78.71 84.2,78.71 65.2,78.71 65.2,82.9 67.6,82.9 67.6,82 80.4,82 80.5,82 80.5,92.503 80.5,103.15 75.85,103.15 49.1,103.15 49.1,110.7 49.1,117.7 49.1,142.6 76.8,142.6 76.8,128.4 134.6,128.4
0V95 on 14_int13_(power) "14_0V95" (solid, pour order 87): 61.407,75.4 61.407,67.8 49.4,67.8 49.4,39.8 42.15,39.8 4.6,39.8 4.6,80 15.4,80 15.4,43.6 39.9,43.6 41.3,43.6 41.3,53.213 41.3,78.3 55.4,78.3 57.5,78.3 77.2,78.3 82.4,78.3 85.8,78.3 85.8,75.4 81.3,75.4
A10_12V on 14_int13_(power) "14_int13_A10_12V" (solid, remove dead copper, pour order 147): 151.25,98.59 160.3,98.59 160.3,66.92 151.25,66.92
1V8 on 14_int13_(power) "14_int13_1V8" (solid, pour order 143): 136.17,131.68 158.7,131.68 158.7,99.3 149.09,99.3 149.09,97.62 136.17,97.62
HPS_0V95 on 14_int13_(power) "14_HPS_0V95" (solid, pour order 85): 9.4,93.7 9.4,88.8 16.2,88.8 16.2,116.55 27.95,116.55 40.6,116.55 40.6,83.2 67.9,83.2 67.9,82.3 70.5,82.3 80,82.3 80,89.6 60,89.6 46.5,89.6 46.5,120.95 24.95,120.95 9.4,120.95 9.4,120.2
GND on 8_int7_(power) "8_int7_GND" (solid, remove dead copper, pour order 158): 0,0 129,0 129,4 175,4 175,155 0,155
VDD_DDR on 8_int7_(power) "8_VDD_DDR" (solid, remove dead copper, pour order 95): 7.675,122.65 7.675,31.325 35.125,31.325 35.125,27.25 68.6,27.25 78.3,27.25 78.3,2.175 79.975,2.175 103.975,2.175 104.625,2.175 104.625,13.175 125.7,13.175 125.7,14.8 148.8,14.8 155.875,14.8 155.875,68.575 155.875,99.675 122.9,99.675 122.175,100.4 115.225,107.35 115.225,132.85 70.55,132.85 70.55,122.65 46.55,122.65 35.825,122.65 31.65,122.65 14.1,122.65 10.7,122.65
GND on 15_int14_(gnd) "15_GND" (solid, remove dead copper, pour order 106): 0,0 129,0 129,4 175,4 175,155 0,155
GND on 2_int1_(gnd) "2_GND" (solid, remove dead copper, pour order 107): 0,0 129,0 129,4 175,4 175,155 0,155
GND on 4_int3_(gnd) "4_GND" (solid, remove dead copper, pour order 109): 0,0 129,0 129,4 175,4 175,155 0,155
GND on 9_int8_(gnd) "9_GND" (solid, remove dead copper, pour order 114): 0,0 129,0 129,4 175,4 175,155 0,155
GND on 11_int10_(gnd) "11_GND" (solid, remove dead copper, pour order 116): 0,0 129,0 129,4 175,4 175,155 0,155
GND on 13_int12_(gnd) "13_GND" (solid, remove dead copper, pour order 118): 0,0 129,0 129,4 175,4 175,155 0,155

## Keep-outs
Keep-Out Layer:
  the board outline again, w0.1

## Other copper
1_Top:
  pour cut-out: 27.26,28.81 27.67,28.81 27.67,28.08 27.26,28.08
  pour cut-out: 145.826,127.59 145.83,126.78 145.56,126.78 145.56,127.59
  pour cut-out: 115.75,131.3 116.07,131.3 116.07,130.21 115.75,130.21
  pour cut-out: 168.4,88.452 168.4,87.91 165.25,87.91 165.25,83.71 164.54,83.71 164.54,86.43 162.9,86.43 162.9,82.48 161.72,82.48 161.72,88.487
  pour cut-out: 134.93,121.065 135.37,121.065 135.37,118.22 142.02,118.22 142.02,117.81 137.56,117.81 137.56,115.45 142.24,115.45 142.24,114.85 135.65,114.85 135.65,117.142 134.91,117.152
  pour cut-out: 109.505,124.785 110.21,124.785 110.21,121.94 116.86,121.94 116.86,121.53 112.4,121.53 112.4,119.15 117.06,119.15 117.06,118.55 109.49,118.55 109.49,121.83
  pour cut-out: 115.03,139.03 115.68,139.03 115.68,137.35 119.27,137.35 119.27,136.82 117.08,136.82 117.08,134.89 119.79,134.89 119.79,134.27 115.8,134.27 115.8,136.82 115.02,136.82 115.02,137.12
  region net PCIE_AUX3V3: 119.19,147.87 116.22,147.87 116.22,146.13 116.79,146.13 116.79,145.61 119.19,145.59
  region net GND: 168.06,87.91 168.06,83.48 166.33,83.48 166.33,82.64 166.21,82.52 166.21,80.05 164.11,80.06 164.11,82.51 163.45,82.51 163.45,83.092 162.92,83.092 162.92,86.43 164.53,86.43 164.53,83.71 165.25,83.71 165.25,87.91
  region net A10_1V0: 115.78,136.83 108.86,136.83 108.86,131.56 115.78,131.56
  region net GND: 117.07,135.15 117.07,136.82 119.27,136.82 119.27,137.35 115.68,137.35 115.68,138.68 115.68,139.43 118.98,139.43 118.98,138.68 120.92,138.68 120.92,138.21 123.02,138.21 123.02,136.28 120.92,136.28 120.92,135.82 119.85,135.82 119.85,135.15
  region net NetC20_2: 117.76,129.01 117.76,124.785 114.59,124.785 109.89,124.785 109.89,129.01
  region net A10_MAIN_3V3: 124.19,117.055 124.19,119.53 118.075,119.53 117.08,118.535 112.45,118.535 112.45,116.095 117.18,116.095 118.14,117.055
  region net GND: 112.4,119.175 112.4,121.495 116.86,121.495 116.86,121.945 110.22,121.945 110.22,124.155 116.76,124.155 116.76,123.035 118.06,123.035 118.161,122.934 121.94,122.835 121.85,120.405 118.42,120.476 117.12,119.175
  region net 1V8: 145.52,130.91 145.52,127.59 134.92,127.59 134.92,130.91
  region net GND: 137.58,115.48 137.58,117.8 142.04,117.8 142.04,118.25 135.4,118.25 135.4,120.46 141.94,120.46 141.94,119.34 143.24,119.34 143.341,119.239 147.12,119.14 147.03,116.71 143.601,116.781 142.3,115.48
  pour cut-out: 62.9,96.3 62.9,57.61 101.5,57.61 101.5,96.3
  pour cut-out: 94.9,43.8 95.5,43.8 95.5,43.6 94.9,43.6
  pour cut-out: 80.9,23.4 82.3,23.4 82.3,23.3 80.9,23.3
  pour cut-out: 84.8,29.8 85.4,29.8 85.4,29.6 84.8,29.6
  pour cut-out: 92.3,130.9 94.8,130.9 94.8,130.7 92.3,130.7
  pour cut-out: 88.201,141.994 90.569,141.994 90.6,141.963 90.6,141.8 88.2,141.8
  pour cut-out: 84.3,136 86.5,136 86.5,135.8 84.3,135.8
  pour cut-out: 78.1,138.2 82.7,138.2 82.7,138 78.1,138
  region net AGND1: 159.78,72.46 159.78,70.76 156.78,70.76 156.78,72.46
  region net AGND6: 130.4,129.44 130.4,127.14 130.4,126.94 132,126.94 132,129.44
  region net AGND3: 156.07,125.66 157.77,125.66 157.77,122.96 156.07,122.96
  region net IO_2V5: 128.2,100.3 133.4,100.3 133.4,98.15 128.2,98.15
  region net 1.2V_AVDLL_PLL: 11.297,34.725 11.297,33.925 11.497,33.925 11.497,31.825 12.797,31.825 12.797,33.525 14.697,33.525 14.697,34.725 14.697,35.925 12.697,35.925 12.697,34.725
  region net IO_2V5: 11.197,36.925 11.197,38.125 10.897,38.125 10.897,39.325 11.197,39.325 12.097,39.325 12.597,39.325 12.597,38.825 12.297,38.825 12.297,38.125 12.097,38.125 12.097,36.925
  region net 1V8_OUT: 143.07,125.39 143.07,121.09 139.77,121.09 135.07,121.09 135.07,125.39
  region net 3V3: 149.37,113.36 149.37,115.75 143.17,115.75 142.26,114.84 137.63,114.84 137.63,112.4 142.36,112.4 143.32,113.36
  region net PCIE_DC_3V3: 123.97,143.88 123.97,145.35 120.81,145.35 120.81,145.75 119.97,145.75 119.97,143.88
  region net PCIE_3V3: 123.79,147.84 119.97,147.84 119.97,146.1 121.39,146.1 121.39,145.58 123.79,145.56
  region net 3V3: 119.47,148.45 119.47,150.15 118.67,150.15 118.67,151.05 117.47,151.05 117.47,148.45
  region net 3V3: 124.17,148.43 122.07,148.43 122.07,150.4 123.27,150.4 123.27,151.3 124.17,151.3
  region net 3V3: 129.24,148.47 126.65,148.47 126.65,150.45 129.24,150.45
  region net A10_MAIN_1V8: 129.85,106 125.22,106 125.22,116.55 129.85,116.55
  region net IO_1V8: 133.37,112.08 130.55,112.08 130.55,115.25 133.37,115.25
  region net PLL_1V8: 133.48,106.07 130.66,106.07 130.66,108.9 133.48,108.9
  region net 2V5: 130.71,101 128.91,101 128.91,102.8 131.09,102.8 131.09,102.21 131.7,101.6 132.71,101.6 132.71,100.7 131.01,100.7
  region net 3V3: 117.73,132.25 117.73,134.05 120.2,134.05 120.2,135.64 121.85,135.64 121.85,132.25
  region net 2V5OUT: 113.65,140.28 113.65,142.8 121.88,142.8 121.88,141.57 120.87,141.57 120.87,139.36 119.47,139.36 119.47,140.28
  region net 2V5: 113.37,142.05 108.83,142.05 108.83,139.26 110.47,139.26 110.47,140.25 113.37,140.25
  region net A10_MAIN_3V3: 143.145,105.17 143.145,108.55 144.645,108.55 144.645,105.17
  region net NetC116_2: 161.68,90.25 156.85,90.25 156.85,83.635 161.034,79.45 161.234,79.45 161.934,79.45 162.334,79.05 163.3,79.05 163.3,82.36 161.68,82.36
  region net IO_5V: 172.98,88.09 172.98,83.85 172.334,83.85 172.334,82.55 168.534,82.55 168.534,83.95 168.534,88.09
  region net ENETB_DVDD: 59.05,36.2 59.05,34.7 61.75,34.7 61.75,34.9 62.85,34.9 62.85,35.1 61.85,35.1 61.85,36.2
  region net IO_2V5: 64.05,34.9 64.05,36.6 65.05,36.6 65.05,35.5 64.75,35.5 64.75,34.9
  region net IO_2V5: 40.6,34.9 40.6,36.6 41.6,36.6 41.6,35.5 41.3,35.5 41.3,34.9
  region net ENETA_DVDD: 35.6,36.2 35.6,34.7 38.3,34.7 38.3,34.9 39.4,34.9 39.4,35.1 38.4,35.1 38.4,36.2
  pour cut-out: 67.1,144.9 68.1,144.9 68.2,144.8 68.114,144.714 67.054,144.714
  pour cut-out: 71.1,144.9 71.96,144.9 72.146,144.714 71.054,144.714
  pour cut-out: 74.5,141.9 76.8,141.9 76.8,141.6 74.5,141.6
  pour cut-out: 115.445,150.655 115.55,150.655 115.55,150.31 115.445,150.31
  pour cut-out: 119.3,145.27 119.805,145.27 119.805,145.485 119.305,145.485 119.3,145.48
  pour cut-out: 38.15,31.15 38.55,31.15 38.55,28.3 38.15,28.3
  pour cut-out: 38.425,27.175 38.425,25.925 38.648,25.925 38.648,27.173 38.65,27.175
  pour cut-out: 50.65,22.7 51.15,22.7 51.15,22.575 50.65,22.575
  pour cut-out: 69.46,33.06 69.74,33.06 69.75,33.05 69.75,32.95 69.4,32.95 69.46,33.01
  pour cut-out: 74.175,29.025 74.4,29.025 74.4,26.825 74.375,26.8 74.2,26.8
  pour cut-out: 74.05,22.7 74.625,22.7 74.625,22.475 74.05,22.475
  pour cut-out: 65.35,34.7 65.775,34.7 65.775,34.3 65.75,34.275 65.35,34.275
  pour cut-out: 84.925,16.25 85.5,16.25 85.525,16.225 85.525,16.15 84.925,16.15
5_int4_(sign):
  region net PCIE_DC_3V3: 120.3,145.5 120.3,143.67 124.1,143.67 124.1,145.5
  region net PCIE_AUX3V3: 115.8,147.8 115.8,146 119.1,146 119.1,147.8
  pour cut-out: 22.675,154.8 22.675,154.225 22.875,154.225 22.875,154.8
  pour cut-out: 55,102.75 105,102.75 105,50.75 103.25,50.75 55,50.75
7_int6_(sign):
  pour cut-out: 124.975,100.6 124.975,99.425 125.275,99.425 125.275,100.6
  pour cut-out: 148.295,96.125 148.97,96.125 148.97,95.97 148.99,95.95 148.965,95.925 148.295,95.925
  pour cut-out: 16.8,121.8 13.9,118.9 13.9,115.5 13.9,32.1 22.7,32.1 22.7,33 32.5,33 90.6,33 90.6,24.6 103.2,24.6 103.2,33 120.5,33 120.5,51.3 129.7,51.3 129.7,97.5 120.5,97.5 120.5,125.94 104.24,125.94 100.1,121.8 73.3,121.8
10_int9_(sign):
  pour cut-out: 18.5,116 18.5,44.5 72.1,44.5 76.4,40.2 87.4,29.2 87.4,17.8 92,17.8 103.1,17.8 103.1,44.5 113,44.5 113,14.7 122.9,14.7 128.35,20.15 131.85,23.65 131.85,45.85 135.85,49.85 135.85,97.71 135.85,102.11 124.5,102.11 124.5,116 85.7,116 69.2,132.5 62.6,132.5 54.9,132.5 54.9,122.8 18.5,122.8
12_int11_(sign):
  pour cut-out: 18.462,117.55 18.462,40.55 41.862,40.55 41.862,32.45 53.262,32.45 58.162,37.35 63.562,37.35 63.562,32.45 64.162,32.45 70.862,32.45 94.162,32.45 114.362,32.45 122.462,40.55 125.862,43.95 162.262,43.95 162.262,53.05 162.262,54.35 131.75,54.35 131.75,100.275 94.875,100.275 94.875,111.075 73.504,132.446 50.112,132.446 50.112,121.45 63.163,108.4 77.487,108.4 77.487,63.525 67.7,63.525 67.7,68.75 69.162,68.75 69.162,72.231 67.7,73.959 67.7,83.3 57.675,93.325 41.094,93.325 41.094,117.55
3_int2_(power):
  pour cut-out: 111.94,123.598 112.99,123.676 112.99,119.9 111.97,119.9 111.94,119.93
  pour cut-out: 146.7,96.71 146.7,95.56 146.35,95.56 146.33,95.58 146.33,96.7
  pour cut-out: 108.53,111.21 109.44,111.21 109.45,111.2 109.45,106.366 108.49,106.356 108.54,110.91
  pour cut-out: 102.51,61.13 102.51,59.59 102.86,59.59 102.85,59.6 102.85,61.13
  pour cut-out: 97.3,58.8 97.3,57.5 99.6,57.5 99.6,58.8
  pour cut-out: 91.7,61.407 91.7,59.1 96,59.1 96,60.7 93.9,60.7 93.9,61.407
  pour cut-out: 93.3,59.1 93.3,57.5 95.6,57.5 95.6,59.1
  pour cut-out: 159.425,45.75 161.075,45.75 161.075,42.75 159.425,42.75
  pour cut-out: 154.7,45.75 156.35,45.75 156.35,42.825 154.7,42.825
  pour cut-out: 140.125,45.8 141.85,45.8 141.85,42.675 140.125,42.675
  pour cut-out: 135.35,45.725 137.075,45.725 137.075,42.775 135.35,42.775
  pour cut-out: 64.5,144.375 64.5,142.6 66.5,142.6 66.5,144.375
  pour cut-out: 68.5,144.35 68.5,142.6 70.5,142.6 70.5,144.35
  pour cut-out: 72.6,144.3 72.6,142.5 74.7,142.5 74.7,144.3
  pour cut-out: 76.3,144.3 76.3,142.5 78.3,142.5 78.3,144.3
  pour cut-out: 82.4,144.35 82.4,142.5 84.4,142.5 84.4,144.35
  pour cut-out: 86.4,144.3 86.4,142.5 88.4,142.5 88.4,144.3
  pour cut-out: 90.4,144.15 90.4,142.4 92.4,142.4 92.4,144.15
  pour cut-out: 94.8,144.2 94.8,142.4 96.7,142.4 96.7,144.2
  pour cut-out: 98.1,139.15 98.1,137.1 102,137.1 102,139.15
14_int13_(power):
  pour cut-out: 149.09,97.62 151.21,97.62 151.21,97.33 151.194,97.314 149.09,97.314
  pour cut-out: 92.8,14.675 92.8,13.475 94.025,13.475 94.025,14.675
15_int14_(gnd):
  pour cut-out: 92.8,14.675 92.8,13.475 94.025,13.475 94.025,14.675
2_int1_(gnd):
  pour cut-out: 98.175,139.125 98.175,137.2 101.95,137.2 101.95,139.125
  pour cut-out: 94.825,144.15 94.825,142.4 96.625,142.4 96.625,144.15
  pour cut-out: 90.5,144.15 90.5,142.425 92.3,142.425 92.3,144.15
  pour cut-out: 86.475,144.275 86.475,142.525 88.325,142.525 88.325,144.275
  pour cut-out: 82.475,144.275 82.475,142.525 84.35,142.525 84.35,144.275
  pour cut-out: 76.325,144.275 76.325,142.5 78.275,142.5 78.275,144.275
  pour cut-out: 72.65,144.3 72.65,142.525 74.65,142.525 74.65,144.3
  pour cut-out: 68.575,144.35 68.575,142.6 70.425,142.6 70.425,144.35
  pour cut-out: 64.575,144.35 64.575,142.6 66.475,142.6 66.475,144.35
  pour cut-out: 135.35,45.725 135.35,42.775 137.075,42.775 137.075,45.725
  pour cut-out: 140.125,45.8 140.125,42.675 141.85,42.675 141.85,45.8
  pour cut-out: 154.7,45.75 154.7,42.825 156.35,42.825 156.35,45.75
  pour cut-out: 159.425,45.75 159.425,42.75 161.075,42.75 161.075,45.75
  pour cut-out: 93.3,59.1 93.3,57.5 95.6,57.5 95.6,59.1
  pour cut-out: 97.3,58.8 97.3,57.5 99.6,57.5 99.6,58.8
  pour cut-out: 91.7,61.407 91.7,59.1 96,59.1 96,60.7 93.9,60.7 93.9,61.407
16_Bottom:
  pour cut-out: 141.87,40.46 141.55,40.46 141.54,40.47 141.54,39.6 141.87,39.6
  pour cut-out: 169.7,121.3 169.7,120.5 169.55,120.5 169.55,121.3
  pour cut-out: 116.9,7.6 117.46,7.6 117.46,7.48 116.9,7.48
  pour cut-out: 12.57,48.59 13.03,48.59 13.03,48.48 12.57,48.48
  pour cut-out: 167.52,116.262 166.92,116.262 166.92,112.028 167.52,112.028
  pour cut-out: 144.7,101.602 144.1,101.602 144.1,97.368 144.7,97.368
  pour cut-out: 149.52,96.975 149.52,97.1 150.77,97.1 150.77,96.98
  pour cut-out: 156.36,67.57 156.36,66.69 155.76,66.69 155.76,63.74 160.63,63.74 160.63,63.36 155.76,63.36 155.76,60.51 155.37,60.51 155.37,67.57 155.76,67.57 155.76,69.645 156.36,69.635
  pour cut-out: 2.15,84.65 5.62,84.65 5.62,84.79 3.78,86.63 3.78,89 6.92,89 6.92,89.83 3.05,89.83 3.05,85.34 1.34,85.34 1.34,76.25 2.15,76.25
  pour cut-out: 1.73,50.75 7.57,50.75 7.57,55.94 8.02,55.94 8.02,50.83 10.82,50.83 10.82,50.15 1.73,50.15
  pour cut-out: 1.35,93.91 4.46,93.91 4.46,93.26 7.22,93.26 7.22,98.36 7.67,98.36 7.67,93.25 11.4,93.25 11.4,92.8 1.35,92.8
  region net GND: 8.71,101.68 6.17,101.68 6.17,99.48 5.529,99.48 5.519,98.561 4.64,98.561 4.64,93.309 7.16,93.309 7.16,98.41 7.71,98.41 7.71,93.309 9.745,93.309 9.745,97.425 8.71,98.46
  region net GND: 2.41,84.49 2.41,82.63 7.26,82.63 7.84,82.63 8.26,83.05 8.26,84.99 7.7,85.37 6.58,85.37 6.58,88.93 3.88,88.93 3.88,86.6 5.79,84.69 5.79,84.49
  region net GND: 9.06,59.27 6.52,59.27 6.52,57.07 5.879,57.07 5.869,56.151 5.12,56.151 5.12,50.899 7.51,50.899 7.51,56 8.06,56 8.06,50.899 9.945,50.899 9.935,55.175 9.06,56.05
  region net GND: 155.84,61.61 155.84,63.321 160.67,63.321 160.67,63.771 155.84,63.771 155.84,66.3 160.81,66.3 161.73,65.38 161.73,64.861 161.831,64.759 166.29,64.759 166.29,62.21 160.98,62.21 160.38,61.61
  pour cut-out: 135.53,40.416 135.53,39.484 135.766,39.484 135.775,39.475 135.775,40.425
  pour cut-out: 94.8,21.8 95.2,21.8 95.2,21.675 94.8,21.675
  pour cut-out: 116.875,11.1 117.5,11.1 117.525,11.125 117.525,10.775 116.875,10.775
  pour cut-out: 28.05,27.575 28.2,27.425 28.2,27.025 28.1,27.025 28.025,26.95 27.95,27.025 27.95,27.25
  pour cut-out: 27.675,30.5 27.95,30.5 27.95,29.425 27.925,29.4 27.9,29.425 27.65,29.425 27.65,30.45
  pour cut-out: 27.85,32.85 27.85,32.375 27.875,32.35 27.7,32.35 27.7,32.8 27.75,32.85
  pour cut-out: 155.831,98.7 155.845,102.275 155.645,102.275 155.62,102.3 155.62,98.7
  pour cut-out: 76.352,84.125 76.683,84.125 76.683,84.023 76.352,84.023
  pour cut-out: 103.009,78.2 103.009,68.3 101.2,68.3 99.8,69.7 92.9,69.7 91.6,71 90.2,71 90.2,71.8 90.3,71.8 90.9,72.4 92,72.4 92,74.239 91.965,74.274 92.048,74.357 92.487,74.357 92.487,75.113 92.215,75.385 92.215,76.085 92.2,76.1 94.3,76.1 94.3,77.1 94.4,77.2 96.1,77.2 96.1,78.2 102,78.2 102,97.2 103.009,97.2
  pour cut-out: 102.8,113.3 106.9,113.3 106.9,113.1 102.8,113.1
  pour cut-out: 98.5,126.8 103,126.8 103,126.6 98.5,126.6
  pour cut-out: 92.7,130.5 94.8,130.5 94.8,130.4 92.7,130.4
  pour cut-out: 85.4,135.8 88.8,135.8 88.8,135.6 85.5,135.6
  pour cut-out: 81.4,138.1 82.7,138.1 82.7,138 81.4,138
  pour cut-out: 75.531,142.277 78.694,142.277 78.694,142.126 78.668,142.1 75.491,142.1
  pour cut-out: 72.3,141.4 73.2,142.3 73.3,142.2 72.4,141.3
  pour cut-out: 64.225,142.6 64.228,142.603 66.699,142.603 66.699,142.426 66.65,142.475 64.225,142.475
  pour cut-out: 68.25,141.625 70.925,141.625 70.925,141.525 68.25,141.525 68.225,141.55
  region net FMCBVADJ: 154.13,59.435 149.73,59.435 149.73,56.62 154.13,56.62
  region net AGND5: 3.9,112.8 3.9,111.1 6.5,111.1 6.5,112.8
  region net AGND4: 11.3,75.9 11.3,74.2 14.2,74.2 14.2,75.9 11.4,75.9
  region net AGND7: 4.5,70.4 4.5,68.8 7.3,68.8 7.3,70.4
  region net AGND8: 171.96,53.98 173.66,53.98 173.66,51.38 171.96,51.38
  region net GND_SIGNAL1: 148.65,66.9 151.35,66.9 151.35,65.2 148.65,65.2
  region net GND_SIGNAL2: 152.5,148.5 154.2,148.5 154.2,145.9 152.5,145.9
  region net A10_0V9: 71,53.4 71,51.7 73.8,51.7 73.8,53.4
  region net IO_2V5: 10.897,37.025 10.897,39.325 12.597,39.325 12.597,38.825 12.397,38.825 12.397,37.025
  region net 1.2V_AVDLL_PLL: 12.697,35.925 12.697,33.625 14.697,33.625 14.697,35.925
  region net NetR82_2: 3.4,76.1 3.4,73.7 5.9,73.7 5.9,75.9 5.9,76.1 5.7,76.1
  region net 0V95: 2.31,81.9 2.31,76.5 8,76.5 8,78.4 8.7,78.4 8.7,79.7 7.7,79.7 7.7,81.9
  region net A10_MAIN_3V3: 7.06,89.71 7.06,85.6 8.7,85.6 8.7,86.8 9.83,86.8 9.83,89.71
  region net HPS_0V95OUT: 14.79,99.42 10.5,99.42 10.5,93.99 14.79,93.99
  region net A10_MAIN_3V3: 5.3,103.93 1.65,103.93 1.65,94.02 4.06,94.02 4.06,99.56 5.3,99.56
  region net HPS_0V95: 12.91,93.59 12.91,89.29 14.61,89.29 14.61,93.59
  region net VDD_DDR: 13.28,49.27 13.28,44.23 14.98,44.23 14.98,49.27
  region net NetC30_2: 15.095,56.95 10.895,56.95 10.895,49.66 15.095,49.66
  region net A10_MAIN_3V3: 5.68,61.45 2.02,61.45 2.02,50.85 4.41,50.85 4.41,57.15 5.68,57.15
  region net MAIN_12V: 154.31,99.35 154.31,101.16 152.045,101.16 149.945,101.16 149.945,99.35
  region net A10_MAIN_1V8: 143.945,97.06 143.945,100.35 137.75,100.35 137.75,97.06
  region net A10_MAIN_3V3: 166.135,69.34 166.135,65.63 161.835,65.63 161.835,67.03 156.46,67.03 156.46,69.34
  region net NetC39_2: 161.635,60.43 161.635,56.13 154.38,56.13 154.38,60.43
  region net ENETB_DVDD: 58.95,33.9 58.95,36.2 61.55,36.2 61.55,35.6 60.55,35.6 60.55,33.9
  region net IO_2V5: 64.05,36.6 64.05,34.4 64.75,34.4 64.75,35.4 65.05,35.4 65.05,36.6
  region net IO_2V5: 40.6,36.6 40.6,34.4 41.3,34.4 41.3,35.4 41.6,35.4 41.6,36.6
  region net ENETA_DVDD: 35.5,33.9 35.5,36.2 38.1,36.2 38.1,35.6 37.1,35.6 37.1,33.9
  pour cut-out: 64.2,144.6 64.9,144.6 64.9,144.3 64.2,144.3